# Altium PCB K601-6252双模带屏 VER 1.1 2026 10 16.PcbDoc (part 9 of 12)
Units mm, origin at the board's own origin, x right, y up, seen from the top; angles counter-clockwise.
Board outline 75.02 x 25.73 mm, 2 copper layers (Top Layer, Bottom Layer); 43 components, 67 nets, 219 pads, 157 vias.
Unrouted connection lines stored in the file: 1.
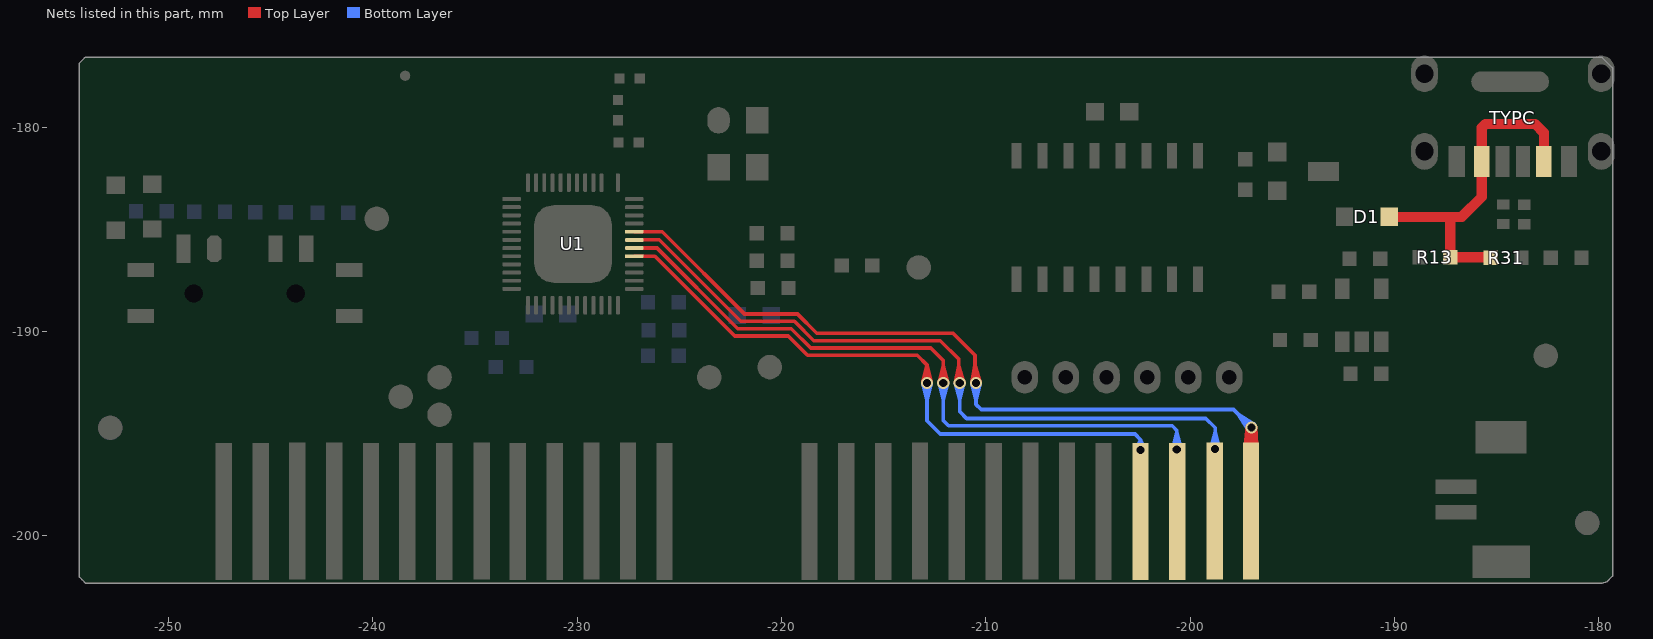
[diagram p9: the nets of this part, all layers, seen from the top]

## Via types
v1: diameter 0.6, hole 0.4, Top Layer to Bottom Layer, tented both sides, 154 vias
v2: diameter 0.6, hole 0.4, Top Layer to Bottom Layer, 3 vias

## Nets (pads, with @x,y where several pads share a name; then routed paths per layer and width w, separated by ;. In a path a pad name is that pad's centre, name@x,y a point inside that pad or via, vN(x,y) a via of type N, cw(c..) or ccw(c..) an arc to the next point about the centre after c; other vN are vias at no path point) (continued)
R4: ?.1@-202.424,-198.813 U1.41 | length 54.3
  Top Layer w0.18: U1.41@-227.2,-186.323 -226.189,-186.323 -222.284,-190.228 -219.661,-190.228 -218.716,-191.173 -213.35,-191.173 -212.875,-191.648 v1(-212.875,-192.522) ; U1.41@-226.845,-186.323 -226.21,-186.323 ; U1.41@-226.845,-186.323 -226.21,-186.323 ; U1.41@-226.845,-186.323 -226.21,-186.323 ; v1@-213.083,-192.496 -212.875,-191.682 ; v1@-213.083,-192.496 -212.875,-191.682 ; v1@-213.083,-192.496 -212.875,-191.682 ; v1@-213.083,-192.496 -212.875,-191.682 ; v1(-212.875,-192.522) -212.875,-191.682 ; v1(-212.875,-192.522) -212.875,-191.682 ; -212.875,-191.682 v1@-212.666,-192.496 ; -212.875,-191.682 v1@-212.666,-192.496 ; -212.875,-191.682 v1@-212.666,-192.496 ; -212.875,-191.682 v1@-212.666,-192.496
  Bottom Layer w0.18: v1@-213.083,-192.549 -212.875,-193.362 ; v1@-213.083,-192.549 -212.875,-193.362 ; v1@-213.083,-192.549 -212.875,-193.362 ; v1@-213.083,-192.549 -212.875,-193.362 ; -212.875,-193.362 v1@-212.666,-192.549 ; -212.875,-193.362 v1@-212.666,-192.549 ; -212.875,-193.362 v1(-212.875,-192.522) ; -212.875,-193.362 v1@-212.666,-192.549 ; -212.875,-193.362 v1(-212.875,-192.522) ; -212.875,-193.362 v1@-212.666,-192.549 ; v1(-212.875,-192.522) -212.875,-194.373 -212.225,-195.023 -202.7,-195.023 -202.425,-195.298 ; v2@-202.63,-195.754 -202.425,-195.298 ; v2@-202.63,-195.754 -202.425,-195.298 ; v2@-202.63,-195.754 -202.425,-195.298 ; v2@-202.63,-195.754 -202.425,-195.298 ; v2(-202.425,-195.798) -202.425,-195.298 ; v2(-202.425,-195.798) -202.425,-195.298 ; v2(-202.425,-195.798) -202.425,-195.298 ; -202.425,-195.298 v2@-202.22,-195.754 ; -202.425,-195.298 v2@-202.22,-195.754 ; -202.425,-195.298 v2@-202.22,-195.754 ; -202.425,-195.298 v2@-202.22,-195.754
R5: ?.1@-200.637,-198.813 U1.42 | length 60
  Top Layer w0.18: U1.42@-227.2,-185.923 -226.08,-185.923 -222.134,-189.868 -219.512,-189.868 -218.567,-190.813 -212.685,-190.813 -212.075,-191.423 v1(-212.075,-192.522) ; U1.42@-226.845,-185.923 -226.21,-185.923 ; U1.42@-226.845,-185.923 -226.21,-185.923 ; U1.42@-226.845,-185.923 -226.21,-185.923 ; v1@-212.283,-192.496 -212.075,-191.682 ; v1@-212.283,-192.496 -212.075,-191.682 ; v1@-212.283,-192.496 -212.075,-191.682 ; v1@-212.283,-192.496 -212.075,-191.682 ; v1(-212.075,-192.522) -212.075,-191.682 ; v1(-212.075,-192.522) -212.075,-191.682 ; -212.075,-191.682 v1@-211.866,-192.496 ; -212.075,-191.682 v1@-211.866,-192.496 ; -212.075,-191.682 v1@-211.866,-192.496 ; -212.075,-191.682 v1@-211.866,-192.496
  Bottom Layer w0.18: v1@-212.283,-192.549 -212.075,-193.362 ; v1@-212.283,-192.549 -212.075,-193.362 ; v1@-212.283,-192.549 -212.075,-193.362 ; v1@-212.283,-192.549 -212.075,-193.362 ; -212.075,-193.362 v1@-211.866,-192.549 ; -212.075,-193.362 v1@-211.866,-192.549 ; -212.075,-193.362 v1(-212.075,-192.522) ; -212.075,-193.362 v1@-211.866,-192.549 ; -212.075,-193.362 v1@-211.866,-192.549 ; -212.075,-193.362 v1(-212.075,-192.522) ; v1(-212.075,-192.522) -212.075,-194.365 -211.817,-194.623 -200.875,-194.623 -200.65,-194.848 v2(-200.65,-195.773) ; v2@-200.858,-195.746 -200.65,-194.933 ; v2@-200.858,-195.746 -200.65,-194.933 ; v2@-200.858,-195.746 -200.65,-194.933 ; v2@-200.858,-195.746 -200.65,-194.933 ; v2(-200.65,-195.773) -200.65,-194.933 ; v2(-200.65,-195.773) -200.65,-194.933 ; -200.65,-194.933 v2@-200.442,-195.746 ; -200.65,-194.933 v2@-200.442,-195.746 ; -200.65,-194.933 v2@-200.442,-195.746 ; -200.65,-194.933 v2@-200.442,-195.746
R6: ?.1@-198.791,-198.794 U1.43 | length 65.4
  Top Layer w0.18: U1.43@-227.2,-185.522 -225.97,-185.522 -221.985,-189.508 -219.363,-189.508 -218.417,-190.453 -212.22,-190.453 -211.325,-191.348 -211.325,-192.472 v1(-211.275,-192.522) ; U1.43@-226.845,-185.522 -226.21,-185.522 ; U1.43@-226.845,-185.522 -226.21,-185.522 ; U1.43@-226.845,-185.522 -226.21,-185.522 ; v1@-211.484,-192.509 -211.325,-191.679 ; v1@-211.484,-192.509 -211.325,-191.679 ; v1@-211.484,-192.509 -211.325,-191.679 ; v1@-211.484,-192.509 -211.325,-191.683 v1@-211.068,-192.484 ; v1@-211.484,-192.509 -211.325,-191.679 ; -211.325,-191.679 v1@-211.068,-192.484 ; -211.325,-191.679 v1(-211.275,-192.522) ; -211.325,-191.679 v1@-211.068,-192.484 ; -211.325,-191.679 v1(-211.275,-192.522) ; -211.325,-191.679 v1@-211.068,-192.484 ; -211.325,-191.679 v1(-211.275,-192.522) ; -211.325,-191.679 v1@-211.068,-192.484 ; -211.325,-191.679 v1(-211.275,-192.522)
  Bottom Layer w0.18: v2@-198.825,-195.873 v2@-198.825,-195.748 ; v1@-211.483,-192.549 -211.275,-193.362 ; v1@-211.483,-192.549 -211.275,-193.362 ; v1@-211.483,-192.549 -211.275,-193.362 ; v1@-211.483,-192.549 -211.275,-193.362 ; -211.275,-193.362 v1@-211.066,-192.549 ; -211.275,-193.362 v1@-211.066,-192.549 ; -211.275,-193.362 v1(-211.275,-192.522) ; -211.275,-193.362 v1@-211.066,-192.549 ; -211.275,-193.362 v1(-211.275,-192.522) ; -211.275,-193.362 v1@-211.066,-192.549 ; v1(-211.275,-192.522) -211.275,-193.923 -210.935,-194.263 -199.228,-194.263 -198.775,-194.716 v2(-198.775,-195.748) ; v2@-198.983,-195.721 -198.775,-194.908 ; v2@-198.983,-195.721 -198.775,-194.908 ; v2@-198.983,-195.721 -198.775,-194.908 ; v2@-198.983,-195.721 -198.775,-194.908 ; v2(-198.775,-195.748) -198.775,-194.908 ; v2(-198.775,-195.748) -198.775,-194.908 ; -198.775,-194.908 v2@-198.567,-195.721 ; -198.775,-194.908 v2@-198.567,-195.721 ; -198.775,-194.908 v2@-198.567,-195.721 ; -198.775,-194.908 v2@-198.567,-195.721
R7: ?.1@-197.018,-198.794 U1.44 | length 569.3
  Top Layer w0.18: U1.44@-227.2,-185.123 -225.828,-185.123 -221.803,-189.148 -219.214,-189.148 -218.268,-190.093 -211.605,-190.093 -210.525,-191.173 -210.525,-192.472 v1(-210.474,-192.522) ; ?.1@-197.327,-195.857 v1@-197.213,-194.887 ; ?.1@-197.327,-195.851 v1@-197.197,-194.772 ; ?.1@-197.328,-195.849 v1@-197.193,-194.778 ; ?.1@-197.328,-195.848 v1@-197.186,-194.883 ; ?.1@-197.324,-195.8 v1@-197.022,-194.777 ; ?.1@-197.324,-195.795 v1@-197.02,-194.867 ; ?.1@-197.322,-195.788 v1@-197.003,-194.903 ; ?.1@-197.322,-195.783 v1@-196.984,-194.877 ; ?.1@-197.31,-195.741 v1@-196.805,-194.77 ; ?.1@-197.309,-195.739 v1@-196.818,-194.828 ; ?.1@-197.308,-195.734 v1@-196.817,-194.874 ; ?.1@-197.304,-195.725 v1@-196.793,-194.896 ; v1@-197.21,-194.704 ?.1@-197.078,-195.623 ; v1@-197.21,-194.703 ?.1@-197.082,-195.648 ; v1@-197.21,-194.7 ?.1@-197.097,-195.54 ; v1@-197.21,-194.697 ?.1@-197.108,-195.533 ; v1@-197.21,-194.696 ?.1@-197.111,-195.533 ; v1@-197.209,-194.721 ?.1@-197.013,-195.538 ; v1@-197.208,-194.728 ?.1@-196.972,-195.623 ; v1@-197.208,-194.727 ?.1@-196.972,-195.65 ; v1@-197.208,-194.67 ?.1@-197.222,-195.572 ; v1@-197.208,-194.665 ?.1@-197.234,-195.52 ; v1@-197.207,-194.664 ?.1@-197.24,-195.516 ; v1@-197.207,-194.732 ?.1@-196.948,-195.648 ; v1@-197.205,-194.744 ?.1@-196.918,-195.535 ; v1@-197.205,-194.745 ?.1@-196.914,-195.535 ; v1@-197.203,-194.751 ?.1@-196.871,-195.61 ; v1@-197.203,-194.75 ?.1@-196.867,-195.638 ; v1@-197.197,-194.771 ?.1@-196.798,-195.535 ; v1@-197.195,-194.775 ?.1@-196.786,-195.52 ; v1@-197.193,-194.78 ?.1@-196.732,-195.6 ; v1@-197.193,-194.78 ?.1@-196.74,-195.573 ; ?.1@-197.146,-195.861 v1@-197.213,-194.887 ; ?.1@-197.147,-195.857 v1@-197.186,-194.883 ; ?.1@-197.147,-195.836 v1@-197.022,-194.777 ; ?.1@-197.147,-195.835 v1@-197.02,-194.867 ; ?.1@-197.143,-195.809 v1@-196.817,-194.874 ; ?.1@-197.142,-195.805 v1@-196.793,-194.896 ; ?.1@-197.018,-198.794 -197,-198.776 v1(-197,-194.698) ; ?.1@-196.891,-195.813 v1@-197.186,-194.883 ; ?.1@-196.892,-195.809 v1@-197.213,-194.887 ; ?.1@-196.889,-195.865 v1@-196.793,-194.896 ; ?.1@-196.888,-195.841 v1@-196.978,-194.79 ; ?.1@-196.888,-195.839 v1@-196.984,-194.877 ; ?.1@-196.888,-195.837 v1@-197.003,-194.903 ; v1@-196.81,-194.787 ?.1@-197.286,-195.556 ; v1@-196.809,-194.786 ?.1@-197.286,-195.568 ; v1@-196.809,-194.785 ?.1@-197.296,-195.592 ; v1@-196.807,-194.781 ?.1@-197.24,-195.516 ; v1@-196.807,-194.779 ?.1@-197.234,-195.52 ; v1@-196.806,-194.779 ?.1@-197.231,-195.523 ; v1@-196.806,-194.778 -197.226,-195.518 v1@-197.208,-194.667 ; v1@-196.798,-194.756 ?.1@-197.162,-195.633 ; v1@-196.796,-194.747 ?.1@-197.097,-195.54 ; v1@-196.794,-194.738 ?.1@-197.082,-195.648 ; v1@-196.794,-194.66 ?.1@-196.734,-195.564 ; v1@-196.793,-194.734 ?.1@-197.056,-195.626 ; v1@-196.793,-194.733 ?.1@-197.058,-195.647 ; v1@-196.793,-194.661 ?.1@-196.74,-195.573 ; v1@-196.792,-194.67 ?.1@-196.786,-195.52 ; v1@-196.79,-194.706 ?.1@-196.928,-195.541 ; v1@-196.79,-194.703 ?.1@-196.918,-195.535 ; v1@-196.79,-194.702 ?.1@-196.914,-195.535 ; ?.1@-196.728,-195.734 v1@-197.213,-194.887 ; ?.1@-196.725,-195.742 v1@-197.186,-194.883 ; ?.1@-196.722,-195.749 v1@-197.197,-194.772 ; ?.1@-196.722,-195.75 v1@-197.193,-194.778 ; ?.1@-196.712,-195.794 v1@-197.02,-194.867 ; ?.1@-196.71,-195.805 v1@-196.984,-194.877 ; ?.1@-196.708,-195.866 v1@-196.793,-194.896 ; ?.1@-196.709,-195.81 v1@-196.978,-194.79 ; ?.1@-196.708,-195.858 v1@-196.817,-194.874 ; U1.44@-226.845,-185.123 -226.21,-185.123 ; U1.44@-226.845,-185.123 -226.21,-185.123 ; U1.44@-226.845,-185.123 -226.21,-185.123 ; v1@-210.684,-192.509 -210.525,-191.679 ; v1@-210.684,-192.509 -210.525,-191.679 ; v1@-210.684,-192.509 -210.525,-191.683 v1@-210.268,-192.484 ; v1@-210.684,-192.509 -210.525,-191.679 ; v1@-210.684,-192.509 -210.525,-191.679 ; -210.525,-191.679 v1@-210.268,-192.484 ; -210.525,-191.679 v1(-210.474,-192.522) ; -210.525,-191.679 v1@-210.268,-192.484 ; -210.525,-191.679 v1(-210.474,-192.522) ; -210.525,-191.679 v1@-210.268,-192.484 ; -210.525,-191.679 v1(-210.474,-192.522) ; -210.525,-191.679 v1@-210.268,-192.484 ; -210.525,-191.679 v1(-210.474,-192.522) ; ?.1@-197.322,-195.787 v1@-197,-194.904 ; ?.1@-197.322,-195.787 v1@-197,-194.904 ; ?.1@-197.322,-195.787 v1@-197,-194.904 ; ?.1@-197.322,-195.787 v1@-197,-194.904 ; ?.1@-197.322,-195.787 v1@-197,-194.904 ; ?.1@-197.322,-195.787 v1@-197,-194.904 ; ?.1@-197.322,-195.787 v1@-197,-194.904 ; ?.1@-197.322,-195.786 v1@-196.978,-194.79 ; ?.1@-197.296,-195.592 v1@-197.206,-194.654 ; ?.1@-197.296,-195.592 v1(-197,-194.698) ; ?.1@-197.292,-195.558 v1@-196.81,-194.788 ; ?.1@-197.292,-195.558 v1@-197.205,-194.654 ; ?.1@-197.292,-195.558 v1(-197,-194.698) ; ?.1@-197.291,-195.556 v1@-196.81,-194.788 ; ?.1@-197.291,-195.556 v1@-197.205,-194.654 ; ?.1@-197.291,-195.556 v1(-197,-194.698) ; ?.1@-197.286,-195.568 v1@-197.206,-194.655 ; ?.1@-197.286,-195.568 v1(-197,-194.698) ; ?.1@-197.287,-195.556 v1@-196.81,-194.787 ; ?.1@-197.287,-195.556 v1@-197.206,-194.655 ; ?.1@-197.287,-195.556 v1(-197,-194.698) ; ?.1@-197.286,-195.556 v1@-197.206,-194.655 ; ?.1@-197.286,-195.556 v1(-197,-194.698) ; ?.1@-197.241,-195.622 v1@-196.804,-194.772 ; ?.1@-197.241,-195.622 -197.208,-194.667 ?.1@-197.233,-195.603 ; ?.1@-197.241,-195.622 v1(-197,-194.698) ; ?.1@-197.24,-195.516 v1(-197,-194.698) ; ?.1@-197.234,-195.52 v1(-197,-194.698) ; ?.1@-197.233,-195.603 v1@-196.804,-194.772 ; ?.1@-197.233,-195.603 v1(-197,-194.698) ; ?.1@-197.231,-195.523 v1@-197.208,-194.666 ; ?.1@-197.231,-195.523 v1(-197,-194.698) ; ?.1@-197.229,-195.532 v1@-196.806,-194.777 ; ?.1@-197.229,-195.532 v1@-197.208,-194.667 ; ?.1@-197.229,-195.532 v1(-197,-194.698) ; ?.1@-197.229,-195.532 v1@-196.806,-194.777 ; ?.1@-197.229,-195.532 v1@-197.208,-194.667 ; ?.1@-197.229,-195.532 v1(-197,-194.698) ; ?.1@-197.229,-195.532 v1@-196.806,-194.777 ; ?.1@-197.229,-195.532 v1@-197.208,-194.667 ; ?.1@-197.229,-195.532 v1(-197,-194.698) ; ?.1@-197.229,-195.532 v1@-196.806,-194.777 ; ?.1@-197.229,-195.532 v1@-197.208,-194.667 ; ?.1@-197.229,-195.532 v1(-197,-194.698) ; ?.1@-197.229,-195.532 v1@-196.806,-194.777 ; ?.1@-197.229,-195.532 v1@-197.208,-194.667 ; ?.1@-197.229,-195.532 v1(-197,-194.698) ; ?.1@-197.229,-195.532 v1@-196.806,-194.777 ; ?.1@-197.229,-195.532 v1@-197.208,-194.667 ; ?.1@-197.229,-195.532 v1(-197,-194.698) ; ?.1@-197.229,-195.532 v1@-196.806,-194.777 ; ?.1@-197.229,-195.532 v1@-197.208,-194.667 ; ?.1@-197.229,-195.532 v1(-197,-194.698) ; ?.1@-197.229,-195.532 v1@-196.806,-194.777 ; ?.1@-197.229,-195.532 v1@-197.208,-194.667 ; ?.1@-197.229,-195.532 v1(-197,-194.698) ; ?.1@-197.229,-195.532 v1@-196.806,-194.777 ; ?.1@-197.229,-195.532 v1@-197.208,-194.667 ; ?.1@-197.229,-195.532 v1(-197,-194.698) ; ?.1@-197.229,-195.532 v1@-196.806,-194.777 ; ?.1@-197.229,-195.532 v1@-197.208,-194.667 ; ?.1@-197.229,-195.532 v1(-197,-194.698) ; ?.1@-197.23,-195.531 v1@-196.806,-194.778 ; ?.1@-197.23,-195.531 v1@-197.208,-194.667 ; ?.1@-197.23,-195.531 v1(-197,-194.698) ; ?.1@-197.228,-195.533 v1@-196.806,-194.777 ; ?.1@-197.228,-195.533 v1@-197.208,-194.667 ; ?.1@-197.228,-195.533 v1(-197,-194.698) ; ?.1@-197.226,-195.585 v1@-196.804,-194.772 ; ?.1@-197.226,-195.585 v1@-197.208,-194.669 ; ?.1@-197.226,-195.585 v1(-197,-194.698) ; ?.1@-197.225,-195.582 v1@-196.804,-194.773 ; ?.1@-197.225,-195.582 v1@-197.208,-194.67 ; ?.1@-197.225,-195.582 v1(-197,-194.698) ; ?.1@-197.223,-195.574 v1@-196.804,-194.773 ; ?.1@-197.223,-195.574 v1@-197.208,-194.67 ; ?.1@-197.223,-195.574 v1(-197,-194.698) ; ?.1@-197.222,-195.572 v1@-196.804,-194.773 ; ?.1@-197.222,-195.572 v1(-197,-194.698) ; v1@-197.213,-194.887 ?.1@-197.018,-195.844 ; v1@-197.21,-194.705 ?.1@-197.075,-195.605 ; v1@-197.21,-194.705 ?.1@-197.073,-195.595 ; v1@-197.21,-194.705 ?.1@-197.073,-195.594 ; v1@-197.21,-194.705 ?.1@-197.075,-195.603 ; v1@-197.21,-194.699 ?.1@-197.1,-195.537 ; v1@-197.21,-194.699 ?.1@-197.1,-195.537 ; v1@-197.21,-194.699 ?.1@-197.1,-195.537 ; v1@-197.21,-194.699 ?.1@-197.1,-195.537 ; v1@-197.21,-194.699 -197.1,-195.534 v1@-196.796,-194.748 ; v1@-197.21,-194.699 ?.1@-197.1,-195.537 ; v1@-197.21,-194.699 ?.1@-197.1,-195.537 ; v1@-197.21,-194.699 ?.1@-197.1,-195.537 ; v1@-197.21,-194.699 ?.1@-197.1,-195.537 ; v1@-197.21,-194.699 ?.1@-197.1,-195.537 ; v1@-197.21,-194.699 ?.1@-197.1,-195.537 ; v1@-197.21,-194.699 ?.1@-197.099,-195.537 ; v1@-197.21,-194.699 ?.1@-197.101,-195.537 ; v1@-197.209,-194.721 ?.1@-197.012,-195.538 ; v1@-197.209,-194.721 ?.1@-197.012,-195.538 ; v1@-197.209,-194.721 ?.1@-197.012,-195.538 ; v1@-197.209,-194.721 ?.1@-197.012,-195.538 ; v1@-197.209,-194.721 ?.1@-197.012,-195.538 ; v1@-197.209,-194.721 ?.1@-197.012,-195.538 ; v1@-197.209,-194.721 ?.1@-197.012,-195.538 ; v1@-197.209,-194.721 ?.1@-197.012,-195.538 ; v1@-197.209,-194.721 ?.1@-197.012,-195.538 ; v1@-197.209,-194.721 ?.1@-197.012,-195.538 ; v1@-197.209,-194.721 ?.1@-197.012,-195.538 ; v1@-197.21,-194.709 ?.1@-197.057,-195.602 ; v1@-197.21,-194.708 ?.1@-197.058,-195.647 ; v1@-197.21,-194.708 ?.1@-197.059,-195.597 ; v1@-197.21,-194.709 ?.1@-197.056,-195.626 ; v1@-197.21,-194.709 ?.1@-197.058,-195.596 ; v1@-197.21,-194.709 ?.1@-197.057,-195.604 ; v1@-197.21,-194.686 ?.1@-197.156,-195.589 ; v1@-197.21,-194.686 ?.1@-197.157,-195.61 ; v1@-197.21,-194.686 ?.1@-197.156,-195.591 ; v1@-197.21,-194.685 ?.1@-197.162,-195.633 ; v1@-197.21,-194.685 ?.1@-197.159,-195.587 ; v1@-197.21,-194.685 ?.1@-197.158,-195.586 ; v1@-197.208,-194.729 ?.1@-196.971,-195.605 ; v1@-197.208,-194.729 ?.1@-196.969,-195.598 ; v1@-197.208,-194.729 ?.1@-196.969,-195.597 ; v1@-197.208,-194.729 ?.1@-196.971,-195.603 ; v1@-197.208,-194.724 ?.1@-197,-195.538 ; v1@-197.208,-194.724 ?.1@-197,-195.538 ; v1@-197.208,-194.724 ?.1@-197,-195.538 ; v1@-197.208,-194.724 ?.1@-197,-195.538 ; v1@-197.207,-194.733 ?.1@-196.953,-195.605 ; v1@-197.207,-194.733 ?.1@-196.955,-195.596 ; v1@-197.207,-194.733 ?.1@-196.949,-195.63 ; v1@-197.207,-194.733 ?.1@-196.954,-195.596 ; v1@-197.207,-194.733 ?.1@-196.952,-195.607 ; v1@-197.205,-194.742 ?.1@-196.924,-195.538 ; v1@-197.205,-194.742 ?.1@-196.924,-195.538 ; v1@-197.205,-194.742 ?.1@-196.924,-195.538 ; v1@-197.205,-194.742 ?.1@-196.924,-195.538 ; v1@-197.205,-194.743 -196.924,-195.535 v1@-196.79,-194.705 ; v1@-197.205,-194.742 ?.1@-196.924,-195.538 ; v1@-197.205,-194.742 ?.1@-196.924,-195.538 ; v1@-197.205,-194.742 ?.1@-196.924,-195.538 ; v1@-197.205,-194.742 ?.1@-196.924,-195.538 ; v1@-197.205,-194.742 ?.1@-196.924,-195.538 ; v1@-197.205,-194.742 ?.1@-196.924,-195.538 ; v1@-197.205,-194.742 ?.1@-196.926,-195.537 ; v1@-197.205,-194.741 ?.1@-196.928,-195.541 ; v1@-197.205,-194.742 ?.1@-196.925,-195.538 ; v1@-197.203,-194.751 ?.1@-196.871,-195.595 ; v1@-197.203,-194.752 ?.1@-196.868,-195.591 ; v1@-197.203,-194.752 ?.1@-196.868,-195.59 ; v1@-197.203,-194.752 ?.1@-196.87,-195.593 ; v1@-197.198,-194.766 ?.1@-196.802,-195.588 ; v1@-197.198,-194.767 ?.1@-196.805,-195.578 ; v1@-197.198,-194.767 ?.1@-196.805,-195.579 ; v1@-197.198,-194.766 ?.1@-196.789,-195.626 ; v1@-197.198,-194.766 ?.1@-196.794,-195.613 ; v1@-197.198,-194.766 ?.1@-196.802,-195.591 ; v1@-197.197,-194.772 ?.1@-196.796,-195.534 ; v1@-197.197,-194.772 ?.1@-197.147,-195.857 ; v1@-197.197,-194.772 ?.1@-196.891,-195.815 ; v1@-197.197,-194.772 ?.1@-197.018,-195.844 ; v1@-197.197,-194.772 ?.1@-196.796,-195.534 ; v1@-197.197,-194.772 ?.1@-196.796,-195.534 ; v1@-197.197,-194.772 ?.1@-196.796,-195.534 ; v1@-197.196,-194.772 -196.799,-195.522 v1@-196.791,-194.674 ; v1@-197.197,-194.772 ?.1@-196.796,-195.534 ; v1@-197.197,-194.772 ?.1@-196.796,-195.534 ; v1@-197.197,-194.772 ?.1@-196.796,-195.534 ; v1@-197.197,-194.772 ?.1@-196.796,-195.534 ; v1@-197.197,-194.772 ?.1@-196.796,-195.534 ; v1@-197.197,-194.772 ?.1@-196.796,-195.534 ; v1@-197.197,-194.772 ?.1@-196.797,-195.535 ; v1@-197.193,-194.778 ?.1@-197.147,-195.857 ; v1@-197.193,-194.778 ?.1@-196.891,-195.815 ; v1@-197.193,-194.778 ?.1@-197.018,-195.844 ; v1@-197.186,-194.883 ?.1@-197.018,-195.844 ; v1@-197.183,-194.822 -197.328,-195.847 v1@-197.183,-194.83 ; v1@-197.183,-194.822 -196.722,-195.749 v1@-197.183,-194.83 ; v1@-197.183,-194.822 ?.1@-197.147,-195.856 ; v1@-197.183,-194.822 ?.1@-196.891,-195.815 ; v1@-197.183,-194.822 ?.1@-197.018,-195.844 ; v1@-197.183,-194.83 ?.1@-197.147,-195.856 ; v1@-197.183,-194.83 ?.1@-196.891,-195.815 ; v1@-197.183,-194.83 ?.1@-197.018,-195.844 ; ?.1@-197.162,-195.633 v1(-197,-194.698) ; ?.1@-197.159,-195.587 v1@-196.799,-194.758 ; ?.1@-197.159,-195.587 v1(-197,-194.698) ; ?.1@-197.158,-195.586 v1@-196.799,-194.758 ; ?.1@-197.158,-195.586 v1(-197,-194.698) ; ?.1@-197.157,-195.61 -196.798,-194.756 ?.1@-197.156,-195.591 ; ?.1@-197.157,-195.61 v1(-197,-194.698) ; ?.1@-197.156,-195.591 v1(-197,-194.698) ; ?.1@-197.156,-195.589 v1@-196.799,-194.758 ; ?.1@-197.156,-195.589 v1(-197,-194.698) ; ?.1@-197.147,-195.832 v1@-197,-194.904 ; ?.1@-197.147,-195.832 v1@-197,-194.904 ; ?.1@-197.147,-195.832 v1@-197,-194.904 ; ?.1@-197.147,-195.832 v1@-197,-194.904 ; ?.1@-197.147,-195.832 v1@-197,-194.904 ; ?.1@-197.147,-195.832 v1@-197,-194.904 ; ?.1@-197.147,-195.832 v1@-197,-194.904 ; ?.1@-197.147,-195.833 v1@-197.003,-194.903 ; ?.1@-197.143,-195.811 v1@-196.818,-194.828 ; ?.1@-197.143,-195.811 v1@-196.806,-194.777 ; ?.1@-197.143,-195.811 v1@-196.805,-194.77 ; ?.1@-197.143,-195.811 v1@-196.817,-194.82 ; ?.1@-197.111,-195.533 -196.797,-194.751 ?.1@-197.108,-195.533 ; ?.1@-197.111,-195.533 v1(-197,-194.698) ; ?.1@-197.108,-195.533 v1(-197,-194.698) ; ?.1@-197.101,-195.537 v1@-196.796,-194.748 ; ?.1@-197.101,-195.537 v1(-197,-194.698) ; ?.1@-197.1,-195.537 v1@-196.796,-194.748 ; ?.1@-197.1,-195.537 v1(-197,-194.698) ; ?.1@-197.1,-195.537 v1@-196.796,-194.748 ; ?.1@-197.1,-195.537 v1(-197,-194.698) ; ?.1@-197.1,-195.537 v1@-196.796,-194.748 ; ?.1@-197.1,-195.537 v1(-197,-194.698) ; ?.1@-197.1,-195.537 v1@-196.796,-194.748 ; ?.1@-197.1,-195.537 v1(-197,-194.698) ; ?.1@-197.1,-195.537 v1@-196.796,-194.748 ; ?.1@-197.1,-195.537 v1(-197,-194.698) ; ?.1@-197.1,-195.537 v1@-196.796,-194.748 ; ?.1@-197.1,-195.537 v1(-197,-194.698) ; ?.1@-197.1,-195.537 v1@-196.796,-194.748 ; ?.1@-197.1,-195.537 v1(-197,-194.698) ; ?.1@-197.1,-195.537 v1@-196.796,-194.748 ; ?.1@-197.1,-195.537 v1(-197,-194.698) ; ?.1@-197.1,-195.537 v1@-196.796,-194.748 ; ?.1@-197.1,-195.537 v1(-197,-194.698) ; ?.1@-197.1,-195.537 v1@-196.796,-194.748 ; ?.1@-197.1,-195.537 v1(-197,-194.698) ; ?.1@-197.099,-195.537 v1@-196.796,-194.748 ; ?.1@-197.099,-195.537 v1(-197,-194.698) ; ?.1@-197.097,-195.54 v1(-197,-194.698) ; ?.1@-197.082,-195.648 v1(-197,-194.698) ; ?.1@-197.078,-195.623 v1@-196.794,-194.739 ; ?.1@-197.078,-195.623 v1(-197,-194.698) ; ?.1@-197.075,-195.605 v1@-196.794,-194.739 ; ?.1@-197.075,-195.605 v1(-197,-194.698) ; ?.1@-197.075,-195.603 v1@-196.794,-194.739 ; ?.1@-197.075,-195.603 v1(-197,-194.698) ; ?.1@-197.073,-195.595 v1@-196.794,-194.739 ; ?.1@-197.073,-195.595 v1(-197,-194.698) ; ?.1@-197.073,-195.594 v1@-196.794,-194.739 ; ?.1@-197.073,-195.594 v1(-197,-194.698) ; ?.1@-197.059,-195.597 v1@-196.794,-194.736 ; ?.1@-197.059,-195.597 v1(-197,-194.698) ; ?.1@-197.058,-195.647 v1(-197,-194.698) ; ?.1@-197.058,-195.596 v1@-196.794,-194.736 ; ?.1@-197.058,-195.596 v1(-197,-194.698) ; ?.1@-197.057,-195.604 v1@-196.793,-194.735 ; ?.1@-197.057,-195.604 v1(-197,-194.698) ; ?.1@-197.057,-195.602 v1@-196.793,-194.735 ; ?.1@-197.057,-195.602 v1(-197,-194.698) ; ?.1@-197.056,-195.626 v1(-197,-194.698) ; v1@-197.022,-194.777 -196.711,-195.797 v1@-197.003,-194.903 ; v1@-197.022,-194.777 -196.888,-195.835 v1@-197.02,-194.867 ; v1@-197.022,-194.777 ?.1@-197.018,-195.844 ; v1@-197.02,-194.867 ?.1@-197.018,-195.844 ; ?.1@-197.019,-195.538 -196.792,-194.728 ?.1@-197.018,-195.539 ; ?.1@-197.019,-195.538 -197.209,-194.719 ?.1@-197.018,-195.539 ; ?.1@-197.019,-195.538 v1(-197,-194.698) ; ?.1@-197.018,-195.539 v1(-197,-194.698) ; ?.1@-197.018,-195.844 v1@-197,-194.904 ; ?.1@-197.018,-195.844 v1@-197,-194.904 ; ?.1@-197.018,-195.844 v1@-197,-194.904 ; ?.1@-197.018,-195.844 v1@-197,-194.904 ; ?.1@-197.018,-195.844 v1@-197,-194.904 ; ?.1@-197.018,-195.844 v1@-197,-194.904 ; ?.1@-197.018,-195.844 v1@-197,-194.904 ; ?.1@-197.018,-195.844 v1@-196.818,-194.828 ; ?.1@-197.018,-195.844 v1@-196.806,-194.777 ; ?.1@-197.018,-195.844 v1@-196.793,-194.896 ; ?.1@-197.018,-195.844 v1@-196.978,-194.79 ; ?.1@-197.018,-195.844 v1@-196.805,-194.77 ; ?.1@-197.018,-195.844 v1@-196.817,-194.874 ; ?.1@-197.018,-195.844 v1@-196.984,-194.877 ; ?.1@-197.018,-195.844 v1@-196.817,-194.82 ; ?.1@-197.018,-195.844 v1@-197.003,-194.903 ; ?.1@-197.012,-195.538 v1@-196.792,-194.727 ; ?.1@-197.012,-195.538 v1(-197,-194.698) ; ?.1@-197.012,-195.538 v1@-196.792,-194.727 ; ?.1@-197.012,-195.538 v1(-197,-194.698) ; ?.1@-197.012,-195.538 v1@-196.792,-194.727 ; ?.1@-197.012,-195.538 v1(-197,-194.698) ; ?.1@-197.012,-195.538 v1@-196.792,-194.727 ; ?.1@-197.012,-195.538 v1(-197,-194.698) ; ?.1@-197.012,-195.538 v1@-196.792,-194.727 ; ?.1@-197.012,-195.538 v1@-196.792,-194.727 ; ?.1@-197.012,-195.538 v1(-197,-194.698) ; ?.1@-197.012,-195.538 v1@-196.792,-194.727 ; ?.1@-197.012,-195.538 v1(-197,-194.698) ; ?.1@-197.012,-195.538 v1@-196.792,-194.727 ; ?.1@-197.012,-195.538 v1(-197,-194.698) ; ?.1@-197.012,-195.538 v1@-196.792,-194.727 ; ?.1@-197.012,-195.538 v1(-197,-194.698) ; ?.1@-197.012,-195.538 v1@-196.792,-194.727 ; ?.1@-197.012,-195.538 v1(-197,-194.698) ; ?.1@-197.012,-195.538 v1@-196.792,-194.727 ; ?.1@-197.012,-195.538 v1(-197,-194.698) ; ?.1@-197.013,-195.538 v1@-196.792,-194.727 ; ?.1@-197.013,-195.538 v1(-197,-194.698) ; ?.1@-197.007,-195.539 -196.792,-194.726 ?.1@-197.006,-195.539 ; ?.1@-197.007,-195.539 -197.209,-194.722 ?.1@-197.006,-195.539 ; ?.1@-197.007,-195.539 v1(-197,-194.698) ; ?.1@-197.006,-195.539 v1(-197,-194.698) ; ?.1@-197,-195.538 v1@-196.792,-194.724 ; ?.1@-197,-195.538 v1@-196.792,-194.724 ; ?.1@-197,-195.538 v1@-196.792,-194.724 ; ?.1@-197,-195.538 v1(-197,-194.698) ; ?.1@-197,-195.538 v1@-196.792,-194.724 ; ?.1@-197,-195.538 v1(-197,-194.698) ; v1@-197,-194.904 ?.1@-196.711,-195.798 ; v1@-197,-194.904 ?.1@-196.888,-195.837 ; v1@-197,-194.904 ?.1@-196.711,-195.798 ; v1@-197,-194.904 ?.1@-196.888,-195.837 ; v1@-197,-194.904 ?.1@-196.711,-195.798 ; v1@-197,-194.904 ?.1@-196.888,-195.837 ; v1@-197,-194.904 ?.1@-196.711,-195.798 ; v1@-197,-194.904 ?.1@-196.888,-195.837 ; v1@-197,-194.904 ?.1@-196.711,-195.798 ; v1@-197,-194.904 ?.1@-196.888,-195.837 ; v1@-197,-194.904 ?.1@-196.711,-195.798 ; v1@-197,-194.904 ?.1@-196.888,-195.837 ; v1@-197,-194.904 ?.1@-196.711,-195.798 ; v1@-197,-194.904 ?.1@-196.888,-195.837 ; v1(-197,-194.698) ?.1@-196.796,-195.534 ; v1(-197,-194.698) ?.1@-196.924,-195.538 ; v1(-197,-194.698) ?.1@-196.796,-195.534 ; v1(-197,-194.698) ?.1@-196.924,-195.538 ; v1(-197,-194.698) ?.1@-196.796,-195.534 ; v1(-197,-194.698) ?.1@-196.796,-195.534 ; v1(-197,-194.698) ?.1@-196.924,-195.538 ; v1(-197,-194.698) ?.1@-196.924,-195.538 ; v1(-197,-194.698) ?.1@-196.796,-195.534 ; v1(-197,-194.698) ?.1@-196.924,-195.538 ; v1(-197,-194.698) ?.1@-196.796,-195.534 ; v1(-197,-194.698) ?.1@-196.924,-195.538 ; v1(-197,-194.698) ?.1@-196.796,-195.534 ; v1(-197,-194.698) ?.1@-196.924,-195.538 ; v1(-197,-194.698) ?.1@-196.796,-195.534 ; v1(-197,-194.698) ?.1@-196.924,-195.538 ; v1(-197,-194.698) ?.1@-196.796,-195.534 ; v1(-197,-194.698) ?.1@-196.924,-195.538 ; v1(-197,-194.698) ?.1@-196.796,-195.534 ; v1(-197,-194.698) ?.1@-196.924,-195.538 ; v1(-197,-194.698) ?.1@-196.739,-195.564 ; v1(-197,-194.698) ?.1@-196.871,-195.595 ; v1(-197,-194.698) ?.1@-196.971,-195.605 ; v1(-197,-194.698) ?.1@-196.802,-195.588 ; v1(-197,-194.698) ?.1@-196.953,-195.605 ; v1(-197,-194.698) ?.1@-196.735,-195.564 ; v1(-197,-194.698) ?.1@-196.868,-195.591 ; v1(-197,-194.698) ?.1@-196.969,-195.598 ; v1(-197,-194.698) ?.1@-196.789,-195.626 ; v1(-197,-194.698) ?.1@-196.948,-195.648 ; v1(-197,-194.698) ?.1@-196.794,-195.526 ; v1(-197,-194.698) ?.1@-196.926,-195.537 ; v1(-197,-194.698) ?.1@-196.732,-195.6 ; v1(-197,-194.698) ?.1@-196.867,-195.638 ; v1(-197,-194.698) ?.1@-196.972,-195.65 ; v1(-197,-194.698) ?.1@-196.805,-195.578 ; v1(-197,-194.698) ?.1@-196.955,-195.596 ; v1(-197,-194.698) ?.1@-196.786,-195.52 ; v1(-197,-194.698) ?.1@-196.914,-195.535 ; v1(-197,-194.698) ?.1@-196.734,-195.564 ; v1(-197,-194.698) ?.1@-196.868,-195.59 ; v1(-197,-194.698) ?.1@-196.969,-195.597 ; v1(-197,-194.698) ?.1@-196.794,-195.613 ; v1(-197,-194.698) ?.1@-196.949,-195.63 ; v1(-197,-194.698) ?.1@-196.798,-195.535 ; v1(-197,-194.698) ?.1@-196.928,-195.541 ; v1(-197,-194.698) ?.1@-196.74,-195.573 ; v1(-197,-194.698) ?.1@-196.871,-195.61 ; v1(-197,-194.698) ?.1@-196.972,-195.623 ; v1(-197,-194.698) ?.1@-196.805,-195.579 ; v1(-197,-194.698) ?.1@-196.954,-195.596 ; v1(-197,-194.698) ?.1@-196.793,-195.525 ; v1(-197,-194.698) ?.1@-196.918,-195.535 ; v1(-197,-194.698) ?.1@-196.739,-195.563 ; v1(-197,-194.698) ?.1@-196.87,-195.593 ; v1(-197,-194.698) ?.1@-196.971,-195.603 ; v1(-197,-194.698) ?.1@-196.802,-195.591 ; v1(-197,-194.698) ?.1@-196.952,-195.607 ; v1(-197,-194.698) ?.1@-196.797,-195.535 ; v1(-197,-194.698) ?.1@-196.925,-195.538 ; v1@-196.984,-194.877 -197.147,-195.83 v1@-196.978,-194.79 ; ?.1@-196.972,-195.65 v1@-196.791,-194.715 ; ?.1@-196.972,-195.623 v1@-196.791,-194.715 ; ?.1@-196.971,-195.605 v1@-196.791,-194.715 ; ?.1@-196.971,-195.603 v1@-196.791,-194.715 ; ?.1@-196.969,-195.598 v1@-196.791,-194.715 ; ?.1@-196.969,-195.597 v1@-196.791,-194.715 ; ?.1@-196.955,-195.596 v1@-196.791,-194.712 ; ?.1@-196.954,-195.596 v1@-196.791,-194.712 ; ?.1@-196.952,-195.607 v1@-196.79,-194.711 ; ?.1@-196.953,-195.605 v1@-196.79,-194.711 ; ?.1@-196.949,-195.63 -196.79,-194.71 ?.1@-196.948,-195.648 ; ?.1@-196.926,-195.537 v1@-196.79,-194.705 ; ?.1@-196.925,-195.538 v1@-196.79,-194.705 ; ?.1@-196.924,-195.538 v1@-196.79,-194.705 ; ?.1@-196.924,-195.538 v1@-196.79,-194.705 ; ?.1@-196.924,-195.538 v1@-196.79,-194.705 ; ?.1@-196.924,-195.538 v1@-196.79,-194.705 ; ?.1@-196.924,-195.538 v1@-196.79,-194.705 ; ?.1@-196.924,-195.538 v1@-196.79,-194.705 ; ?.1@-196.924,-195.538 v1@-196.79,-194.705 ; ?.1@-196.924,-195.538 v1@-196.79,-194.705 ; ?.1@-196.924,-195.538 v1@-196.79,-194.705 ; ?.1@-196.924,-195.538 v1@-196.79,-194.705 ; ?.1@-196.889,-195.861 v1@-196.806,-194.777 ; ?.1@-196.889,-195.861 v1@-196.805,-194.77 ; ?.1@-196.889,-195.861 v1@-196.817,-194.874 ; ?.1@-196.871,-195.61 v1@-196.79,-194.692 ; ?.1@-196.871,-195.595 v1@-196.79,-194.692 ; ?.1@-196.87,-195.593 v1@-196.79,-194.692 ; ?.1@-196.868,-195.591 v1@-196.79,-194.691 ; ?.1@-196.868,-195.59 v1@-196.79,-194.691 ; ?.1@-196.867,-195.638 v1@-196.79,-194.691 ; v1@-196.818,-194.828 -196.708,-195.857 v1@-196.817,-194.82 ; v1@-196.818,-194.828 -196.889,-195.861 v1@-196.817,-194.82 ; v1@-196.817,-194.82 -197.31,-195.74 v1@-196.806,-194.777 ; ?.1@-196.805,-195.578 -196.791,-194.676 ?.1@-196.805,-195.579 ; v1@-196.806,-194.777 -196.708,-195.86 v1@-196.805,-194.77 ; ?.1@-196.802,-195.588 -196.791,-194.676 ?.1@-196.802,-195.591 ; ?.1@-196.798,-195.535 v1@-196.791,-194.674 ; ?.1@-196.797,-195.535 v1@-196.791,-194.673 ; ?.1@-196.796,-195.534 v1@-196.791,-194.673 ; ?.1@-196.796,-195.534 v1@-196.791,-194.673 ; ?.1@-196.796,-195.534 v1@-196.791,-194.673 ; ?.1@-196.796,-195.534 v1@-196.791,-194.673 ; ?.1@-196.796,-195.534 v1@-196.791,-194.673 ; ?.1@-196.796,-195.534 v1@-196.791,-194.673 ; ?.1@-196.796,-195.534 v1@-196.791,-194.673 ; ?.1@-196.796,-195.534 v1@-196.791,-194.673 ; ?.1@-196.796,-195.534 v1@-196.791,-194.673 ; ?.1@-196.796,-195.534 v1@-196.791,-194.673 ; ?.1@-196.794,-195.613 -196.791,-194.675 ?.1@-196.789,-195.626 ; ?.1@-196.794,-195.526 -196.792,-194.672 ?.1@-196.793,-195.525 ; ?.1@-196.794,-195.526 -197.196,-194.773 ?.1@-196.793,-195.525 ; v1@-196.793,-194.661 ?.1@-196.739,-195.564 ; v1@-196.793,-194.66 ?.1@-196.735,-195.564 ; v1@-196.793,-194.661 ?.1@-196.732,-195.6 ; v1@-196.793,-194.661 ?.1@-196.739,-195.563 ; ?.1@-196.739,-195.564 -197.193,-194.781 ?.1@-196.739,-195.563 ; ?.1@-196.735,-195.564 -197.192,-194.782 ?.1@-196.734,-195.564
  Bottom Layer w0.18: v1@-210.683,-192.549 -210.474,-193.362 ; v1@-210.683,-192.549 -210.474,-193.362 ; v1@-210.683,-192.549 -210.474,-193.362 ; v1@-210.683,-192.549 -210.474,-193.362 ; -210.474,-193.362 v1@-210.266,-192.549 ; -210.474,-193.362 v1@-210.266,-192.549 ; -210.474,-193.362 v1(-210.474,-192.522) ; -210.474,-193.362 v1@-210.266,-192.549 ; -210.474,-193.362 v1@-210.266,-192.549 ; -210.474,-193.362 v1(-210.474,-192.522) ; v1(-210.474,-192.522) -210.474,-193.573 -210.225,-193.823 -197.875,-193.823 v1(-197,-194.698) ; -197.682,-194.016 v1@-197.164,-194.829 ; -197.682,-194.016 v1@-196.869,-194.534 ; -197.682,-194.016 v1(-197,-194.698) ; -197.682,-194.016 v1@-197.164,-194.829 ; -197.682,-194.016 v1@-196.869,-194.534 ; -197.682,-194.016 v1(-197,-194.698) ; -197.682,-194.016 v1@-197.164,-194.829 ; -197.682,-194.016 v1@-196.869,-194.534 ; -197.682,-194.016 v1(-197,-194.698) ; -197.682,-194.016 v1@-197.164,-194.829 ; -197.682,-194.016 v1@-196.869,-194.534 ; -197.682,-194.016 v1(-197,-194.698) ; -197.682,-194.016 v1@-197.164,-194.829 ; -197.682,-194.016 v1@-196.869,-194.534 ; -197.682,-194.016 v1(-197,-194.698)
USB5V: D1.1 R13.1 R31.1 TYPC.2 TYPC.5 | length 41
  Top Layer w0.5: D1.1@-190.253,-184.398 -187.375,-184.398 ; R13.1@-187.137,-186.374 R31.1@-185.287,-186.398 ; R31.1@-185.425,-186.396 R13.1@-187.275,-186.373 ; TYPC.5@-182.69,-181.693 -182.69,-180.283 ; -187.375,-184.398 -187.275,-184.498 R13.1@-187.275,-186.373 ; -187.375,-184.398 -186.7,-184.398 -185.73,-183.427 ; R13.1@-187.275,-186.373 -185.312,-186.373 R31.1@-185.287,-186.398 ; R13.1@-187.275,-186.373 R31.1@-185.425,-186.396 ; R13.1@-187.275,-186.373 R31.1@-185.425,-186.396 ; R13.1@-187.275,-186.373 R31.1@-185.425,-186.396 ; -185.73,-183.427 TYPC.2@-185.73,-181.693 -185.73,-180.037 ; -185.73,-183.427 TYPC.2@-185.73,-182.075 ; -185.73,-183.427 TYPC.2@-185.73,-182.075 ; -185.73,-183.427 TYPC.2@-185.73,-182.075 ; TYPC.2@-185.73,-181.311 -185.73,-180.037 ; TYPC.2@-185.73,-181.311 -185.73,-180.037 ; TYPC.2@-185.73,-181.311 -185.73,-180.037 ; -185.73,-180.037 -185.54,-179.848 -183.125,-179.848 -182.69,-180.283 ; R31.1@-185.287,-186.398 -187.138,-186.373 R31.1@-185.287,-186.398 ; TYPC.5@-182.69,-181.311 -182.69,-180.283 ; TYPC.5@-182.69,-181.311 -182.69,-180.283 ; TYPC.5@-182.69,-181.311 -182.69,-180.283